# Altium PCB PCB1.PcbDoc
Units mm, origin at the board's own origin, x right, y up, seen from the top; angles counter-clockwise.
Board outline 30 x 30 mm, 2 copper layers (Top Layer, Bottom Layer); 33 components, 18 nets, 96 pads, 10 vias.
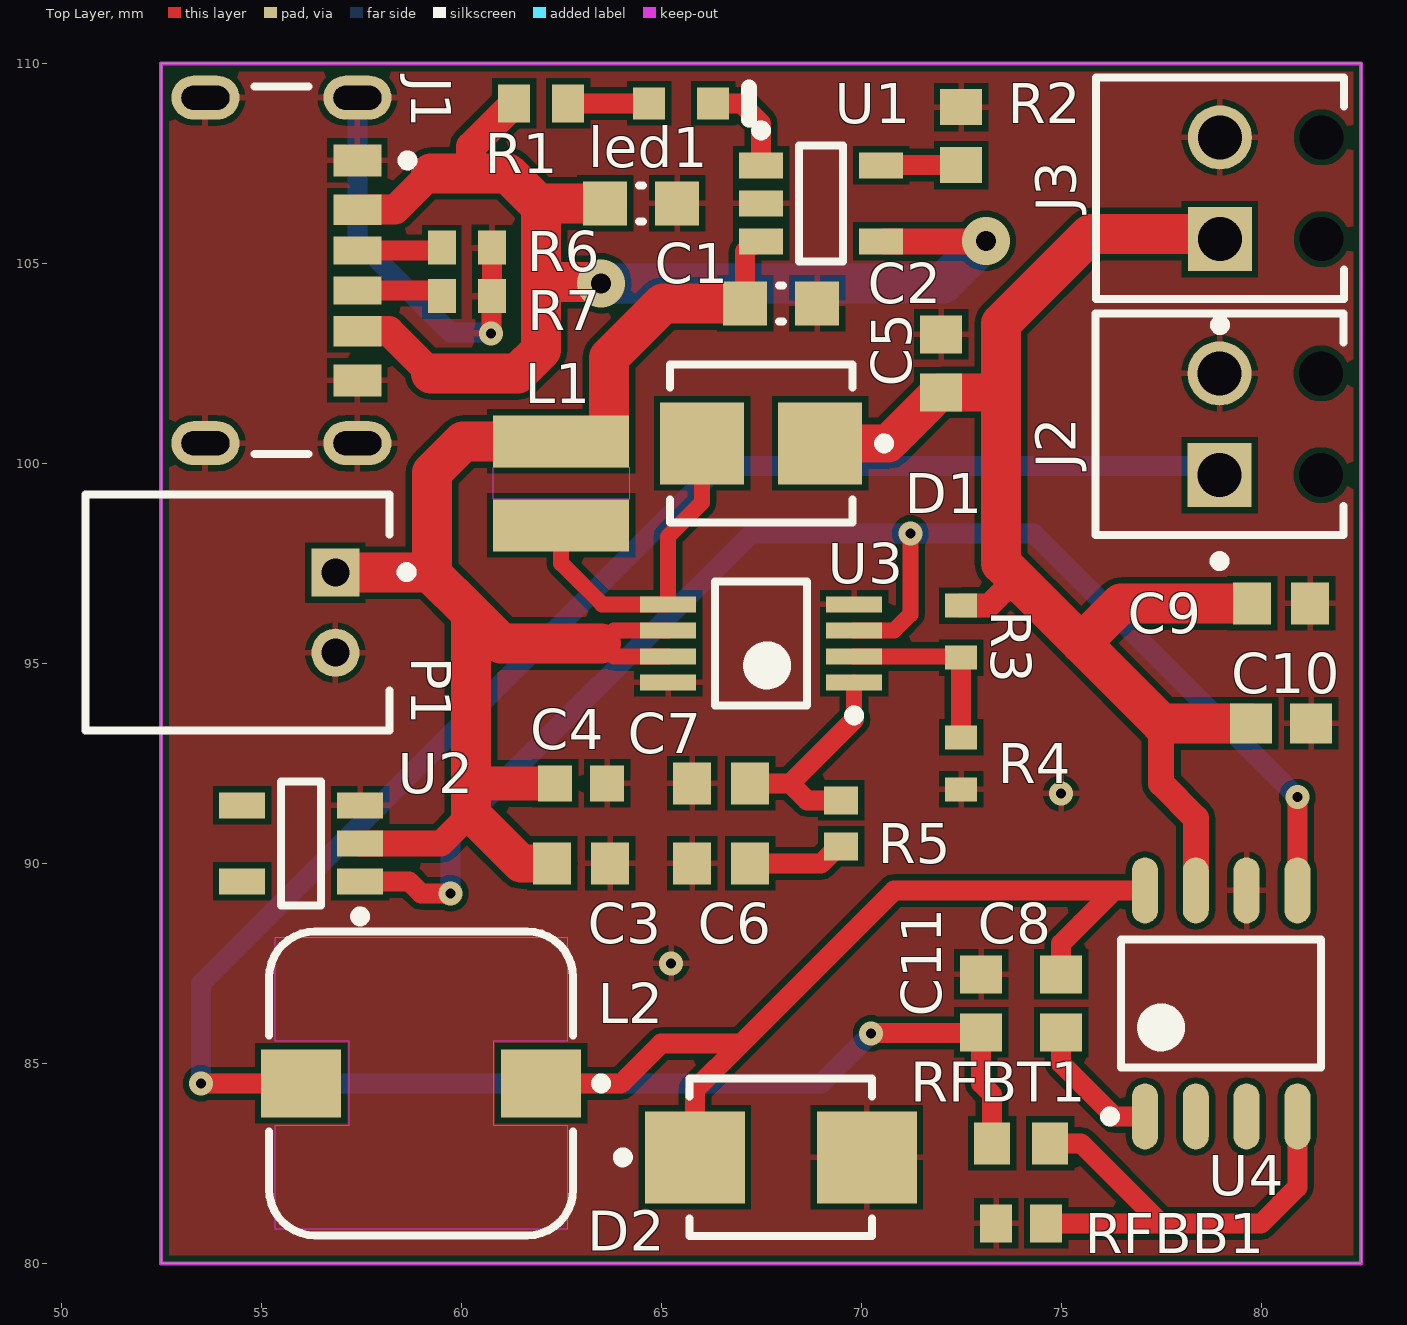
[diagram p0: Top Layer view]
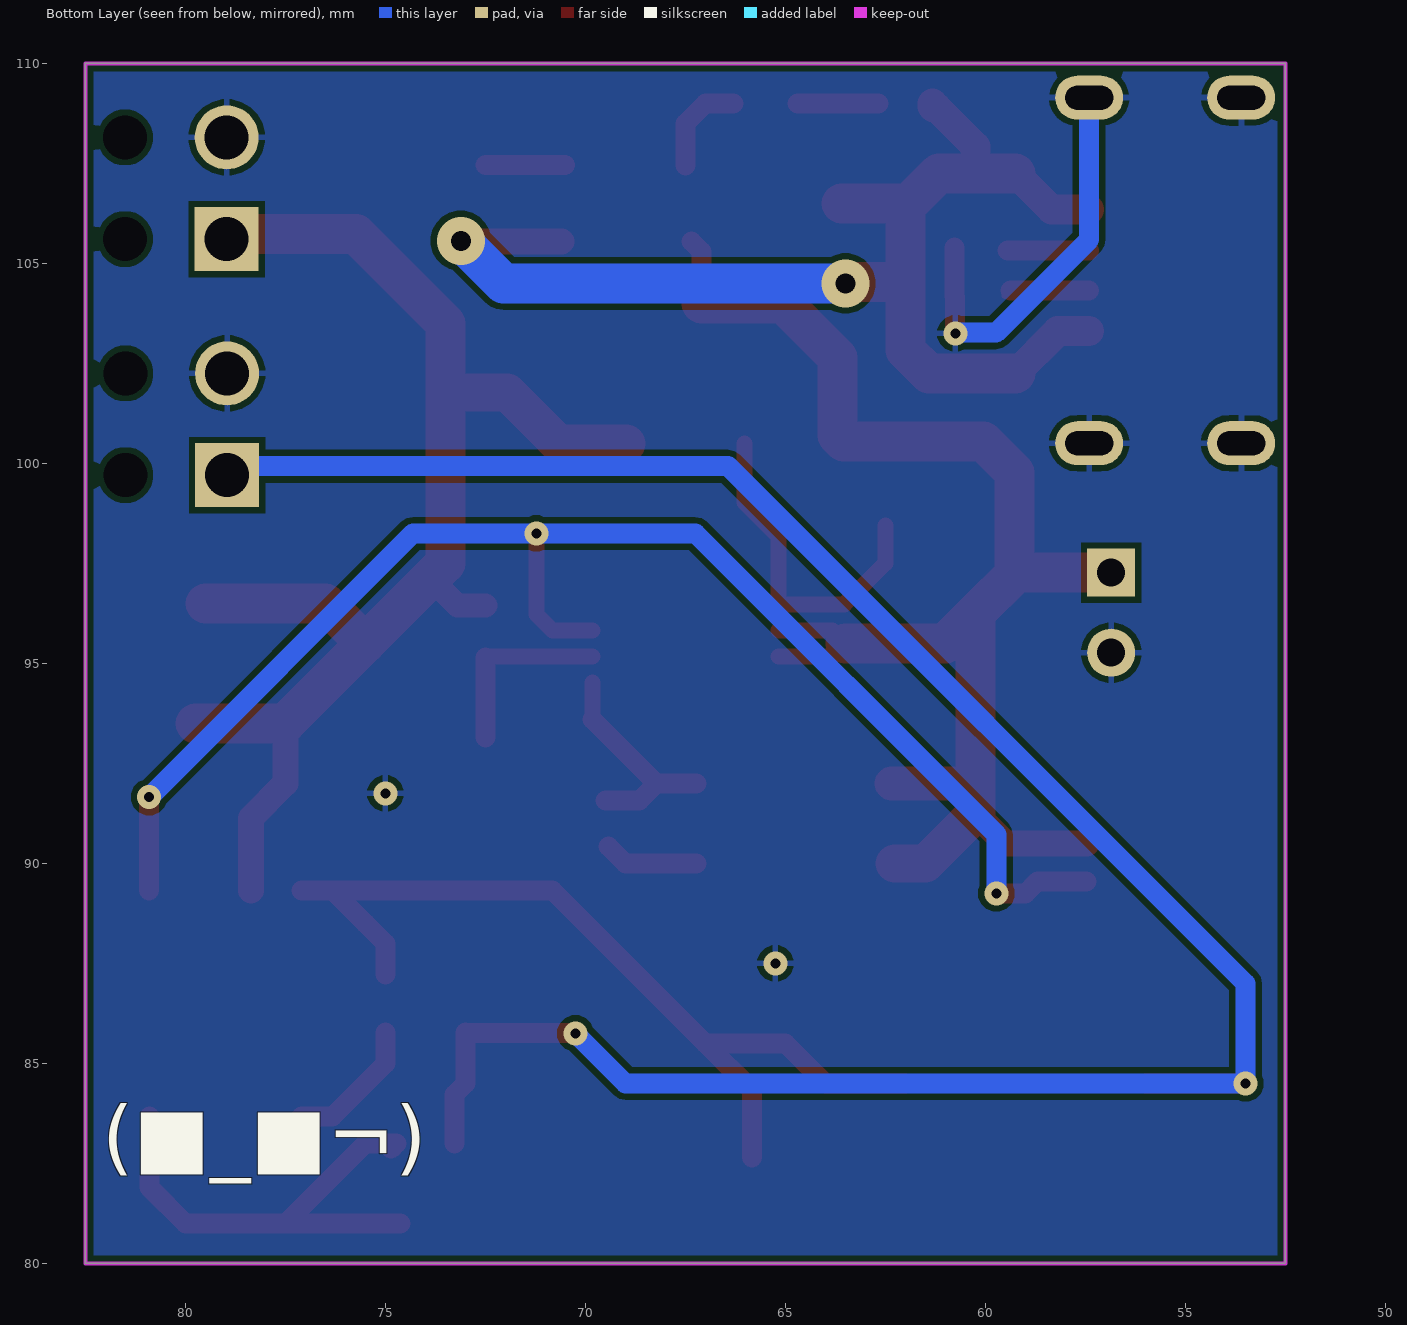
[diagram p1: Bottom Layer view, seen from below]

## Layer stack, top to bottom
Top Solder: solder mask 0.0102, Solder Resist, Dk 3.5
Top Layer: signal copper 0.0356
Dielectric 1: dielectric 0.32, FR-4, Dk 4.8
Bottom Layer: signal copper 0.0356
Bottom Solder: solder mask 0.0102, Solder Resist, Dk 3.5

## Board outline
52.5,80 82.5,80 82.5,110 52.5,110

## Design rules (kind name [scope] priority, off if disabled: settings)
BoardOutlineClearance [All] p1: gap=0.2 ignorepadtopadclearanceinfootprint=FALSE
Clearance [All] p1: gap=0.15 ignorepadtopadclearanceinfootprint=FALSE
HoleSize [All] p1: absolutevalues=TRUE maxlimit=3.5 minlimit=0.25 maxpercent=80.000 minpercent=20.000
HoleToHoleClearance [All] p1: gap=0.25 allowstackedmicrovias=TRUE
MinimumAnnularRing [All] p1: minimumring=0.175
MinimumSolderMaskSliver [All] p1: minsoldermaskwidth=0.075
PolygonConnect [All] p1: connectstyle=Relief reliefconductorwidth=0.15 reliefentries=4 polygonreliefangle="90 Angle" airgapwidth=0.15
RoutingVias [All] p1: holewidth=0.25 width=0.6 viastyle="Through Hole" minholewidth=0.25 minwidth=0.6 maxholewidth=2 maxwidth=1.5
SilkToSilkClearance [All] p1: silktosilkclearance=0.3
SilkToSolderMaskClearance [IsPad] p1: minsilkscreentomaskgap=0.1 clearancetoexposedcopper=TRUE
SolderMaskExpansion [All] p1: expansion=0.03 istentingtop=FALSE
SupplyNets "Schematic Supply Nets_4" [InNet('5V')] p1: voltage=0.000
SupplyNets "Schematic Supply Nets_3" [InNet('Vcc')] p2: voltage=0.000
SupplyNets "Schematic Supply Nets_2" [InNet('Vbat')] p3: voltage=0.000
SupplyNets "Schematic Supply Nets_1" [InNet('GND')] p4: voltage=0.000
SupplyNets "Schematic Supply Nets" [InNet('3.3V')] p5: voltage=0.000
UnRoutedNet [All] p1: checkbadconnections=TRUE
Width [All] p1: maxlimit=3 minlimit=0.15 preferedwidth=0.15
24 further rules are at their usual default settings.

## Classes and differential pairs
component class "Voltage Regulator Buck": C8 C10 D1 L2 RFBB1 RFBT1 U4
component class "Voltage Detector": U2
component class "Charge Management": C1 C6 led1 R1 R2 U1
component class top: J1 J2 J3 P1 R1 R4
component class "Voltage Regulators Boost": C1 C5 C6 D1 L2 R1 R2 R4 U3

## Components (designator, comment, footprint, x,y, rotation, side; value= is the part's Value field where it differs from the comment)
C1 "4.7uF" CAPC0603(1608)100_M 64.5,106.5 r180 top
C2 "4.7uF" CAPC0603(1608)100_M 68,104 r180 top
C3 "22uF" CAPC1608X90X35ML10T15 63,90 r180 top
C4 "0.1uF" CAPC1608X90X35LL15T15 63,92 r180 top
C5 "22uF" CAPC1608X90X35ML10T15 72,102.5 r270 top
C6 "4.7nF" CAPC1608X90X35ML10T15 66.5,90 r0 top
C7 "4.7nF" CAPC1608X90X35ML10T15 66.5,92 r0 top
C8 "10nF" CAPC1608X90X35ML10T15 75,86.5 r90 top
C9 "22uF" CAPC1608X90X35ML10T15 80.5,96.5 r180 top
C10 "2.2uF" CAPC1608X90X35NL15T15 80.5,93.5 r180 top
C11 "22uF" CAPC1608X90X35ML10T15 73,86.5 r270 top
D1 "15V 1A" FP-DO-214BA-IPC_C 67.5,100.5 r180 top value=150pF
D2 "60V, 1A" FP-SMB-MFG 67.992,82.654 r0 top
J1 "USB4125-GF-A-0190" FP-USB4125-GF-A-0190-MFG 54.407,104.825 r270 top
J2 "1725656" PHOE-1725656-2 78.96,100.98 r90 top
J3 "1725656" PHOE-1725656-2 78.969,106.881 r90 top
L1 "10uH, 2A" WE-MAIA_3015 62.5,99.5 r270 top
L2 "39uH, 1.1A" WE-PD_7332R 59,84.5 r270 top
led1 "598-8070-107F" DIAL-0603-2_V 65.5,109 r180 top
P1 "S2B-PH-K-S(LF)(SN)" JST-S2B-PH-K-S_V 54.407,96.268 r270 top
R1 "470Ω" RESC1608X55X30NL15T15 62,109 r180 top
R2 "2kΩ" RESC1608X55X30ML15T15 72.5,108.184 r270 top
R3 "82kΩ" RESC1608X55X25LL10T15 72.5,95.797 r270 top
R4 "27kΩ" RESC1608X55X25LL10T15 72.5,92.5 r270 top
R5 "1kΩ" RESC1609X50X30LL10T20 69.5,91 r90 top
R6 "5.1kΩ" RESC1608X55X30LL15T15 60.143,105.393 r0 top
R7 "5.1kΩ" RESC1608X55X30LL15T15 60.143,104.181 r0 top
RFBB1 "1.3kΩ" RESC1609X50X30NL10T20 74,81 r180 top
RFBT1 "2kΩ" RESC1608X55X30ML15T15 74,83 r0 top
U1 "MCP73831T-2DCI/OT" MCP73831T-2DCI/OT 69,106.5 r0 top
U2 "BD53E30G-MTR" BD53E30G-MTR 56,90.5 r180 top
U3 "ISL97519AIUZ" ISL97519AIUZ 67.5,95.5 r180 top
U4 "LM22671MRX-ADJ" LM22671MRX-ADJ/NOPB 79,86.5 r90 top

## Footprints (in the part's own frame and the unit in brackets; to place one, negate y for a bottom-side part, rotate by r counter-clockwise, add the part's x,y. Pads: shape width x height; smd on the part's side, far side on the other; paste and mask are expansions set on the pad)
BD53E30G-MTR [mm] "SOT23, 5-Leads, Body 2,90x2,80mm, Pitch 0,95mm, IPC Low Density"
  rect 1.15x0.65 smd: 1(-1.475,0.95) 2(-1.475,0) 3(-1.475,-0.95) 4(1.475,-0.95) 5(1.475,0.95)
  silkscreen extent -1.6,-1.55 0.5,1.95, body extent -0.9,-1.55 0.9,1.55, height 1.25
CAPC0603(1608)100_M [mm] "Chip Capacitor, Body 1.6x0.8mm, Height 1.0mm, IPC Low Density"
  rect 1.1x1.1 smd: 1(-0.9,0) 2(0.9,0)
  silkscreen extent -0.05,-0.45 0.05,0.45, body extent -0.87,-0.47 0.88,0.48, height 1
CAPC1608X90X35LL15T15 [mm] "Chip Capacitor, 2-Leads, Body 1.60x0.81mm, IPC High Density"
  rect 0.85x0.9 smd: 1(-0.65,0) 2(0.65,0)
  body extent -0.88,-0.48 0.87,0.48, height 0.9
CAPC1608X90X35ML10T15 [mm] "Chip Capacitor, 2-Leads, Body 1.60x0.80mm, IPC Low Density"
  rect 0.95x1.05 smd: 1(-0.725,0) 2(0.725,0)
  body extent -0.85,-0.45 0.85,0.45, height 0.9
CAPC1608X90X35NL15T15 [mm] "Chip Capacitor, 2-Leads, Body 1.60x0.81mm, IPC Medium Density"
  rect 1.05x1 smd: 1(-0.75,0) 2(0.75,0)
  body extent -0.88,-0.48 0.87,0.48, height 0.9
DIAL-0603-2_V [mm] "LED, 2-Leads, Body 1.6x0.8mm"
  rect 0.8x0.8 smd: 1(-0.8,0) 2(0.8,0)
  silkscreen extent -1.7,-0.4 -1.7,0.4, body extent -0.81,-0.39 0.81,0.39, height 0.71
FP-DO-214BA-IPC_C [mm]
  rect 2.1x2.05 smd paste+0 mask+0: 1(-1.475,0) 2(1.475,0)
  silkscreen extent -3.2,-1.97 2.28,1.97, body extent -2.63,-2.07 2.63,2.07, height 0.25
FP-SMB-MFG [mm]
  rect 2.5x2.3 smd paste+0 mask+0: 1(-2.15,0) 2(2.15,0)
  silkscreen extent -4.07,-1.97 2.28,1.97, body extent -3.5,-2.07 3.5,2.07, height 0.25
FP-USB4125-GF-A-0190-MFG [mm]
  rrect100% 1.1x1.7 hole 0.6 slot 1.2 at 90 deg paste-2539.97 mask+0: 1(-4.32,3) 2(4.32,3) 3(-4.32,-0.8) 4(4.32,-0.8)
  rect 0.7x1.2 smd paste+0 mask+0: A5(-0.5,3) B5(0.5,3)
  rect 0.76x1.2 smd paste+0 mask+0: A9(1.52,3) B9(-1.52,3)
  rect 0.8x1.2 smd paste+0 mask+0: A12(2.75,3) B12(-2.75,3)
  silkscreen extent -4.59,0.43 4.59,4.38, body extent -4.97,-3.57 4.97,3.95, height 0.25
ISL97519AIUZ [mm] "TSOP, 8-Leads, Body 3,00x3,00mm, Pitch 0,65mm, IPC Low Density"
  rect 1.4x0.4 smd: 1(-2.325,0.975) 2(-2.325,0.325) 3(-2.325,-0.325) 4(-2.325,-0.975) 5(2.325,-0.975) 6(2.325,-0.325) 7(2.325,0.325) 8(2.325,0.975)
  silkscreen extent -2.45,-1.55 1.15,1.92, body extent -1.55,-1.55 1.55,1.55, height 1.1
JST-S2B-PH-K-S_V [mm] "THD, 2-Leads, Body 7.6x5.9mm, Pitch 2mm"
  rect 1.2x1.2 hole 0.7: 1(-1,2.45)
  round 1.2 hole 0.7: 2(1,2.45)
  silkscreen extent -2.95,-3.8 2.95,4.35, body extent -2.95,-3.8 2.95,3.8, height 4.8
LM22671MRX-ADJ/NOPB [mm] "SOIC, 8-Leads, Body 4,90x3,90mm, Pitch 1,27mm, IPC Low Density"
  oval 1.65x0.65 smd: 1(-2.825,1.905) 2(-2.825,0.635) 3(-2.825,-0.635) 4(-2.825,-1.905) 5(2.825,-1.905) 6(2.825,-0.635) 7(2.825,0.635) 8(2.825,1.905)
  silkscreen extent -2.95,-2.5 1.6,2.9, body extent -2,-2.5 2,2.5, height 1.7
MCP73831T-2DCI/OT [mm] "SOT23, 5-Leads, Body 2,90x2,80mm, Pitch 0,95mm, IPC Low Density"
  rect 1.1x0.65 smd: 1(-1.5,0.95) 2(-1.5,0) 3(-1.5,-0.95) 4(1.5,-0.95) 5(1.5,0.95)
  silkscreen extent -1.62,-1.45 0.55,1.95, body extent -0.95,-1.45 0.95,1.45, height 1.45
PHOE-1725656-2 [mm] "Connector, 2-Leads, Body 6.2x5.4mm, Pitch 2.54mm"
  rect 1.6x1.6 hole 1.1: 1(-1.27,0)
  round 1.6 hole 1.1: 2(1.27,0)
  round 0 hole 1.1 unplated: MH1(-1.27,-2.54) MH2(1.27,-2.54)
  silkscreen extent -3.54,-3.1 2.77,3.1, body extent -2.77,-3.1 2.77,3.1, height 9
RESC1608X55X25LL10T15 [mm] "Chip Resistor, 2-Leads, Body 1.60x0.80mm, IPC High Density"
  rect 0.6x0.8 smd: 1(-0.65,0) 2(0.65,0)
  body extent -0.85,-0.45 0.85,0.45, height 0.55
RESC1608X55X30LL15T15 [mm] "Chip Resistor, 2-Leads, Body 1.60x0.80mm, IPC High Density"
  rect 0.7x0.85 smd: 1(-0.625,0) 2(0.625,0)
  body extent -0.87,-0.48 0.87,0.48, height 0.55
RESC1608X55X30ML15T15 [mm] "Chip Resistor, 2-Leads, Body 1.60x0.80mm, IPC Low Density"
  rect 0.9x1.05 smd: 1(-0.725,0) 2(0.725,0)
  body extent -0.87,-0.48 0.87,0.48, height 0.55
RESC1608X55X30NL15T15 [mm] "Chip Resistor, 2-Leads, Body 1.60x0.80mm, IPC Medium Density"
  rect 0.8x0.95 smd: 1(-0.675,0) 2(0.675,0)
  body extent -0.87,-0.48 0.87,0.48, height 0.55
RESC1609X50X30LL10T20 [mm] "Chip Resistor, 2-Leads, Body 1.55x0.85mm, IPC High Density"
  rect 0.7x0.85 smd: 1(-0.575,0) 2(0.575,0)
  body extent -0.82,-0.48 0.82,0.48, height 0.5
RESC1609X50X30NL10T20 [mm] "Chip Resistor, 2-Leads, Body 1.55x0.85mm, IPC Medium Density"
  rect 0.8x0.95 smd: 1(-0.625,0) 2(0.625,0)
  body extent -0.82,-0.48 0.82,0.48, height 0.5
WE-MAIA_3015 [mm] "SMD Power Inductor, 2-leads, body 3x3mm"
  rect 1.3x3.4 smd: 1(-1.05,0) 2(1.05,0)
  Top Layer keep-out region: -0.4,1.7 0.4,1.7 0.4,-1.7 -0.4,-1.7
  body extent -1.5,-1.5 1.5,1.5, height 1.5
WE-PD_7332R [mm] "SMT Shielded Power Inductor, 2-leads, body 7.3x7.3mm"
  rect 1.7x2 smd: 1(0,3) 2(0,-3)
  Top Layer keep-out region: 3.65,-3.65 1.05,-3.65 1.05,-1.8 -1.05,-1.8 -1.05,-3.65 -3.65,-3.65 -3.65,3.65 -1.05,3.65 -1.05,1.8 1.05,1.8 1.05,3.65 3.65,3.65
  silkscreen extent -3.8,-3.8 3.8,4.63, body extent -3.65,-3.65 3.65,3.65, height 3.22

## Part data
C1 C2: library part CMP-1035-02783-1, "CAP 4.7uF 6.3V -20% to +80% 0603 (1608 Metric) Thickness 1mm SMD", Case-EIA=0603, Case-Metric=1608, Rated Voltage="6.3 V", Tolerance="-20% to +80%", Max Thickness="1 mm", Technology=SMT
C3 C5 C9 C11: library part CMP-2006-02789-1, Manufacturer=Murata, Part Number=GRM188R60G226MEA0L
C4: library part CMP-2006-02168-1, Manufacturer="AVX Interconnect / Elco", Part Number=LD035C104KAB2A
C6 C7: library part CMP-2006-02924-1, Manufacturer=Murata, Part Number=GRM188R71H472KA01D
C8: library part CMP-2100-03642-1, "Chip Capacitor, 10 nF, +/- 10%, 50 V, -55 to 125 degC, 0603 (1608 Metric), RoHS, Tape and Reel", Case Code (Imperial)=0603, Case Code (Metric)=1608, Dielectric=X7R, Dielectric Material=Ceramic, Insulation Resistance=10GR, Manufacturer=Murata, Max Operating Temperature=125degC, Min Operating Temperature=-55degC, Package Description="2-Pin Surface Mount Device, Body 1.6 x 0.8 mm", Package Quantity=1, Tolerance=10%, Voltage=50V, Capacitance=10nF, Case/Package=0603, Datasheet URL=http://search.murata.co.jp/Ceramy/image/img/A01X/G101/ENG/GRM188R71H103KA01-01.pdf, Datasheet Version=42401.0, Depth=0.8mm, Height=0.8mm, Lead Free=LeadFree, Length=1.6mm, Manufacturer URL=http://www.murata.com/, Material=Ceramic, Mount=SurfaceMount, Number of Pins=2, Package Reference=0603, Packaging=TapeandReel, REACH SVHC=Unknown, RoHSCompliant=True, Termination=SMD/SMT, Thickness=0.035inch, Voltage Rating=50V, Voltage Rating (DC)=50V, Width=0.031inch
C10: library part CMP-2006-04537-1, Manufacturer="AVX Interconnect / Elco", Part Number=0603YD225MAT2A
D1: library part CMP-2000-06604-2, "LSM115JE3/TR13 DIODE SCHOTTKY 15V 1A DO214BA", Capacitance=150pF, Forward Current=1A, Manufacturer=Microsemi, Manufacturer Part Number=LSM115JE3/TR13, Max Junction Temp=+100°C, Max Repetitive Reverse Voltage=15V, Max Surge Forward Current=50A, Package=DO-214BA, Peak Reverse Current=10mA, Temperature="-55°C to +100°C", Temperature Range Low=-55°C, Automotive=No, Category=Diode, ComponentLink2Description=Datasheet, ComponentLink2URL=https://media.digikey.com/pdf/Data%20Sheets/Microsemi%20PDFs/LSM115J.pdf, Device Class L1="Discrete Semiconductors", Device Class L2=Diodes, Device Class L3="Rectifier Diodes", Digikey Description="DIODE SCHOTTKY 15V 1A DO214BA", Footprint Url=https://www.microsemi.com/packaging-information/partpackage/details?pid=5147, Height=2.92mm, Lead Free=Yes, Mouser Description="Schottky Diodes & Rectifiers Schottky Rectifier", Octopart=https://octopart.com/lsm115je3%2Ftr13-microsemi-17743343, Reverse Voltage=15V, RoHS=TRUE, Standoff Height=0.01mm, Temperature Range High=+100°C
D2: library part CMP-12790-000073-1, "DIODE SCHOTTKY 60V 1A SMB", Average Rectified Current=1A, Capacitance=110pF, Case/Package=SMB, Forward Voltage=700mV, Max Forward Surge Current (Ifsm)=30A, Max Operating Temperature=150°C, Max Repetitive Reverse Voltage (Vrrm)=60V, Min Operating Temperature=-65°C, Package Quantity=3000, Peak Reverse Current=500uA, Contact Plating=Tin, Current Rating=1A, Element Configuration=Single, Forward Current=1A, Height=2.42mm, Lead Free="Lead Free", Length=4.57mm, Max Reverse Voltage (DC)=60V, Mount="Surface Mount", Number of Pins=2, Output Current=1A, Packaging="Tape and Reel", Peak Non-Repetitive Surge Current=30A, Polarity=Standard, Radiation Hardening=No, REACH SVHC="No SVHC", Termination=SMD/SMT, Voltage Rating (DC)=60V, Weight=0.00328oz, Width=3.94mm
J1: library part CMP-245163-000004-1, "CONN RCPT TYPE C 6P SMD RA"
J2 J3: library part CMP-2000-05299-1, "Male Header, Pitch 2.54 mm, 1 x 2 Position, Height 9 mm, Tail Length 3.5 mm", Colour=Green, Manufacturer="Phoenix Contact", Content=250pc(s), Datasheet URL=http://datasheet.octopart.com/1725656-Phoenix-Contact-datasheet-5302866.pdf, Datasheet Version=Apr-08, Industrial packaging=Yes, Manufacturer part No.=1725656, Manufacturer URL=http://www.phoenixcontact.com/, Number of contacts=2, Pitch=2.54mm, Type=MPT0,5/2-2,54
L1: library part CMP-03913-56466825-2, "78438335100 Inductor, Aec-Q200, 10Uh, Shielded/0.85A Rohs Compliant: Yes", Ambient Temperature Range High=85°C, Ambient Temperature Range Low=-40°C, Case Code (Imperial)=1212, Case Code (Metric)=3030, Current Rating=850mA, DC Resistance (DCR)=446mΩ, Inductance=10µH, Max Operating Temperature=125°C, Ratings=AEC-Q200, Saturation Current=2A, Self Resonant Frequency=21MHz, Test Frequency=100kHz, Tolerance=30%, Case/Package=1212, Composition=Wirewound, Core Material=Ferrite, Height=1.5mm, Height - Seated (Max)=1.4986mm, Length=3mm, Min Operating Temperature=-40°C, Mount="Surface Mount", NexarPartId=56466825, Number of Pins=2, RoHS=Compliant, Shielding=Shielded, Width=3mm
L2: library part CMP-1396-00047-2, Ambient Temperature Range High=85°C, Ambient Temperature Range Low=-40°C, Case/Package=Nonstandard, Current Rating=1.03A, DC Resistance (DCR)=209mΩ, Inductance=39µH, Inductance Tolerance=20%, Max Operating Temperature=125°C, Resistance=320mΩ, Saturation Current=1.1A, Self Resonant Frequency=15MHz, Test Frequency=1kHz, Composition=Wirewound, Core Material=Ferrite, Height=3.2mm, Height - Seated (Max)=3.5052mm, Length=7.3mm, Max DC Current=1.03A, Min Operating Temperature=-40°C, Mount="Surface Mount", NexarPartId=22866977, Number of Pins=2, Packaging="Cut Tape (CT)", REACH SVHC=Unknown, RMS Current (Irms)=1.03A, RoHS=Compliant, Series Resistance=320mΩ, Shielding=Shielded, Termination=SMD/SMT, Tolerance=20%, Width=7.3mm
led1: library part CMP-2000-05654-1, "Single Color LED, 2 V, -30 to 85 degC, 2-Pin SMD (0603), RoHS, Tape and Reel", Emitting Color=YellowGreen, Forward Current=25mA, Forward Voltage=2.4V, Manufacturer=Dialight, Operating Temp Range=-40Cto100C, Operating Temperature Classification=Industrial, Package Description="2-Pin Surface Mount Device, Body 1.6 x 0.8 mm", Package Reference=0603, Package Type=SMD, Power Dissipation=60W, Reverse Voltage=5V, Test Current (It)=20mA, Chip Material=GaP, Datasheet URL=https://datasheet.ciiva.com/4688/598-selectorguide-18902-4688880.pdf, Datasheet Version="Rev. 2, 10/2008", DELETED=Compliant, Dominant Wave Length=568nm, High Brightness=No, Lens Dimensions=1.1x0.8x0.4mm, Lum Intensity=20mcd, Luminous Intensity=20mcd, Main Category=ChipLED, Manufacturer URL=http://www.dialight.com/, Mounting=SurfaceMount, Mounting Technology=SurfaceMount, Number of  Elements=1, Packaging=TapeandReel, Pin Count=2, Product Depth (mm)=0.8mm, Product Height (mm)=0.7mm, Product Length (mm)=1.6mm, Rad Hardened=No, Shape Type=Rectangular, Type=Uni-Color, Viewing Angle=140deg
P1: library part CMP-1755-00004-1, "Male Header, Pitch 2 mm, 1 x 2 Position, Height 4.8 mm, Tail Length 3.4 mm, -25 to 85 degC, RoHS, Bulk", Capacitance="10 uF", Case\Package=Radial, Max Operating Temperature="85 degC", Min Operating Temperature="-40 degC", Package Quantity=200, Tolerance=20%, Voltage Rating="50 V", ComponentLink1Description=Datasheet, ComponentLink1URL=http://www.jst-mfg.com/product/pdf/eng/ePH.pdf, DatasheetVersion=Dec-12, Diameter="5 mm", Height="11 mm", Lead Pitch="2 mm", Length="11 mm", Mount="Through Hole", PackageDescription="Male Header, Pitch 2 mm, 1 x 2 Position, Height 4.8 mm, Tail Length 3.4 mm", PackageReference=S2B-PH-K-S, Packaging=Bulk, Pins=2, Radiation Hardening=No, REACH SVHC="No SVHC", RoHSCompliant=true, Voltage Rating (DC)="50 V"
R1: library part CMP-2000-00795-1, Manufacturer=Panasonic, Part Number=ERJ-3GEYJ471V
R2 RFBT1: library part CMP-2000-00317-1, Manufacturer=Panasonic, Part Number=ERJ-3EKF2001V
R3: library part CMP-2000-06947-1, "Chip Resistor, 82 KOhm, +/- 1%, 0.1 W, -55 to 155 degC, 0603 (1608 Metric), RoHS, Tape and Reel", Case Code - in=0603, Case Code - mm=1608, Manufacturer=Yageo, Operating Temperature Range=-55Cto+155C, Package / Case=0603(1608metric), Package Description="2-Pin Surface Mount Device, Body 1.6 x 0.8 mm", Power Rating=100mW, Resistance=82kOhms, Temperature Coefficient=100PPM/C, Tolerance=1%, Voltage Rating=75V, Brand=Yageo, Datasheet URL=http://www.yageo.com/documents/recent/PYu-RC_Group_51_RoHS_L_7.pdf, Datasheet Version="Rev. 7, 05/2017", Height=0.45mm, Length=1.6mm, Manufacturer URL=http://www.yageo.com/, Mounting Technology=SurfaceMount, Package Reference=0603, Packaging=Reel, Product=ThickFilmResistorsGeneralPurpose, Product Category=ThickFilmResistors, RoHS=True, Series=RC, Termination Style=SMD/SMT, Type=GeneralPurposeChipResistorSurfaceMount, Unit Weight=0.000071oz, Width=0.8mm
R4: library part CMP-2000-06933-1, "Chip Resistor, 27 KOhm, +/- 1%, 0.1 W, -55 to 155 degC, 0603 (1608 Metric), RoHS, Tape and Reel", Case Code - in=0603, Case Code - mm=1608, Manufacturer=Yageo, Operating Temperature Range=-55Cto+155C, Package Description="2-Pin Surface Mount Device, Body 1.6 x 0.8 mm", Power Rating=100mW, Resistance=27kOhms, Temperature Coefficient=100PPM/C, Tolerance=1%, Voltage Rating=50V, Datasheet URL=http://www.yageo.com/documents/recent/PYu-RC_Group_51_RoHS_L_7.pdf, Datasheet Version="Rev. 7, 05/2017", Manufacturer URL=http://www.yageo.com/, Mounting Technology=SurfaceMount, Package Reference=0603, Packaging=Reel, Product=ThickFilmResistorsGeneralPurpose, Series=RC, Termination Style=SMD/SMT
R5: library part CMP-2000-02972-1, Manufacturer="Vishay Dale", Part Number=CRCW06031K00FKEC
R6 R7: library part CMP-2000-00803-1, Manufacturer=Panasonic, Part Number=ERJ-3GEYJ512V
RFBB1: library part CMP-2000-02988-1, Manufacturer="Vishay Dale", Part Number=CRCW06031K30FKEA

## Via types
v1: diameter 0.6, hole 0.25, Top Layer to Bottom Layer, 8 vias
v2: diameter 1.2, hole 0.5, Top Layer to Bottom Layer, 2 vias

## Nets (pads, with @x,y where several pads share a name; then routed paths per layer and width w, separated by ;. In a path a pad name is that pad's centre, name@x,y a point inside that pad or via, vN(x,y) a via of type N, cw(c..) or ccw(c..) an arc to the next point about the centre after c; other vN are vias at no path point)
3.3V: C11.2 J2.1 L2.2 RFBT1.1 | length 59
  Top Layer w0.5: v1(53.5,84.5) L2.2 ; v1(70.25,85.75) 70.262,85.763 72.987,85.763 C11.2 73,84.5 73.275,84.225 RFBT1.1
  Bottom Layer w0.5: v1(70.25,85.75) 69,84.5 v1(53.5,84.5) 53.5,87 66.431,99.931 J2.1@79.209,99.931
5V: C5.2 C9.2 C10.2 D1.1 J3.1 R3.1 U4.7 | length 35.7
  Top Layer w0.15: C5.2@71.95,101.775 C5.2 ; 73.5,97.347 73.5,97.5
  Top Layer w0.6: R3.1 73.197,96.447 73.75,97
  Top Layer w0.65: 77.5,93.5 77.5,92 78.365,91.135 U4.7
  Top Layer w0.95: D1.1 70.675,100.5 C5.2@71.95,101.775 ; C5.2 73.225,101.775
  Top Layer w1: J3.1@78.96,105.74 75.74,105.74 73.5,103.5 73.5,97.5 75.5,95.5 ; C9.2@79.5,96.5 76.5,96.5 75.5,95.5 ; C10.2 77.5,93.5 75.5,95.5
GND: C1.1 C2.1 C3.1 C4.1 C5.1 C6.1 C7.1 C9.1 C10.1 C11.1 D2.2 J1.1 J1.2 J1.3 J1.4 J1.A12 J1.B12 J2.2 J3.2 P1.2 R2.1 R4.2 R6.2 R7.2 RFBB1.2 U1.2 U2.3 U3.4 U3.8 U4.6 | length 10
  Top Layer w0.5: v1(60.75,103.25) 60.759,103.259 60.759,104.172 R7.2 R6.2
  Bottom Layer w0.5: J1.1 57.407,105.593 59.731,103.269 60.731,103.269 v1(60.75,103.25)
  other v1: 65.25,87.5 75,91.75
NetC6_2: C6.2 R5.1 | length 2.5
  Top Layer w0.15: R5.1@69.425,90.425 R5.1
  Top Layer w0.5: C6.2 69,90 R5.1@69.425,90.425
NetC7_2: C7.2 R5.2 U3.1 | length 5.6
  Top Layer w0.4: 69.825,93.6 U3.1
  Top Layer w0.5: C7.2 68.225,92 ; R5.2 68.65,91.575 68.225,92 ; 69.825,93.6 68.225,92
NetC8_1: C8.1 U4.1 | length 3.4
  Top Layer w0.5: C8.1 75,85 76.325,83.675 U4.1
NetC8_2: C8.2 D2.1 L2.1 U4.8 | length 23.1
  Top Layer w0.5: L2.1 64,84.5 65,85.5 67,85.5 ; D2.1 65.842,84.342 67,85.5 ; C8.2 75,88 75.5,88.5 76.325,89.325 ; U4.8 76.325,89.325 ; 67,85.5 70.825,89.325 76.325,89.325
NetD1_2: D1.2 L1.2 U3.5 | length 8.4
  Top Layer w0.4: L1.2 62.5,97.5 63.525,96.475 U3.5 65.175,98.175 66.025,99.025 D1.2
NetJ1_A5: J1.A5 R6.1 | length 2.1
  Top Layer w0.15: R6.1@59.45,105.325 R6.1
  Top Layer w0.5: J1.A5 R6.1@59.45,105.325
NetJ1_B5: J1.B5 R7.1 | length 2.2
  Top Layer w0.15: R7.1@59.374,104.325 R7.1
  Top Layer w0.5: J1.B5 R7.1@59.374,104.325
Netled1_1: led1.1 U1.1 | length 2.5
  Top Layer w0.5: led1.1 67,109 67.5,108.5 U1.1
Netled1_2: led1.2 R1.1 | length 2
  Top Layer w0.5: R1.1 led1.2
NetR2_2: R2.2 U1.5 | length 2
  Top Layer w0.15: U1.5 U1.5@70.509,107.459
  Top Layer w0.5: U1.5@70.509,107.459 R2.2
NetR3_2: R3.2 R4.1 U3.2 | length 4.7
  Top Layer w0.15: R3.2@72.472,95.175 R3.2
  Top Layer w0.4: U3.2 R3.2@72.472,95.175
  Top Layer w0.5: R4.1 R3.2
NetRFBB1_1: RFBB1.1 RFBT1.2 U4.4 | length 12.3
  Top Layer w0.15: RFBT1.2 74.725,82.925 RFBT1.2@74.8,82.925
  Top Layer w0.5: RFBB1.1 77.5,81 ; RFBT1.2 75.5,83 77.5,81 ; RFBT1.2@74.8,82.925 RFBT1.2@74.855,82.87 ; U4.4 80.905,81.905 80,81 77.5,81
NetU2_1: U2.1 U3.3 U4.5 | length 36.8
  Top Layer w0.4: U3.3 70.825,95.825 71.229,96.229 v1(71.229,98.251) ; U4.5 U4.5@80.906,89.326 ; v1@80.906,91.657 v1(80.908,91.658)
  Top Layer w0.5: U2.1 58.702,89.55 59.001,89.251 v1@59.702,89.251 ; U4.5@80.906,89.326 v1@80.906,91.657
  Bottom Layer w0.5: v1(59.729,89.251) 59.729,90.729 67.251,98.251 v1(71.229,98.251) 74.315,98.251 v1(80.908,91.658)
Vbat: C2.2 C3.2 C4.2 L1.1 P1.1 U1.3 U2.2 U3.6 U3.7 | length 38.8
  Top Layer w0.15: U1.3@67.35,105.55 U1.3
  Top Layer w0.4: U3.7 63.825,95.175 63.5,95.5 63.825,95.825 U3.6
  Top Layer w0.5: C2.2 67.1,105.3 U1.3@67.35,105.55
  Top Layer w0.65: U2.2 57.915,90.5 59.5,90.5 60.25,91.25
  Top Layer w0.85: 60.247,92 60.25,92 C4.2
  Top Layer w0.95: 60.25,91.25 61.5,90 C3.2
  Top Layer w1: P1.1 59.232,97.268 ; 60.25,91.25 60.25,92 60.25,96.25 ; 63.5,95.5 61,95.5 60.25,96.25 ; C2.2 65.05,104 63.7,102.65 63.7,100.7 63.55,100.55 60.05,100.55 59.268,99.768 59.268,97.305 59.232,97.268 ; 59.232,97.268 60.25,96.25
Vcc: C1.2 J1.A9 J1.B9 R1.2 U1.4 | length 32.4
  Top Layer w0.15: 62,106.414 62.086,106.5 ; U1.4 U1.4@70.55,105.5
  Top Layer w0.5: U1.4@70.55,105.5 U1.4@70.6,105.55
  Top Layer w0.65: U1.4@70.6,105.55 73.105,105.55 v2(73.117,105.563)
  Top Layer w0.75: J1.A9 58.195,103.305 59.25,102.25 ; J1.B9 57.412,106.35 58.35,106.35 59.25,107.25 ; 60.25,107.25 60.25,107.925 61.225,108.9 61.3,108.9 61.325,108.925 R1.2
  Top Layer w1: 59.25,102.25 61.414,102.25 62,102.836 62,104.75 ; 59.25,107.25 60.25,107.25 61.164,107.25 62,106.414 62,104.75 ; 62.086,106.5 C1.2 ; v2(63.5,104.5) 63.462,104.538 62.212,104.538 62,104.75
  Bottom Layer w1: v2(63.5,104.5) 72.055,104.5 v2(73.117,105.563)
pads on no net: J2.MH1 J2.MH2 J3.MH1 J3.MH2 U2.4 U2.5 U4.2 U4.3

## Polygon pours and split planes (outlines as drawn)
GND on Top Layer "GND_L01_P000" (solid, pour order 0): 52.5,110 82.5,110 82.5,80 52.5,80
GND on Bottom Layer "GND_L02_P002" (solid, pour order 2): 52.5,110 82.5,110 82.5,80 52.5,80

## Keep-outs
Keep-Out Layer:
  the board outline again, w0.1

## Silkscreen, mask and mechanical layers (free items; w line width, h text height)
Bottom Overlay:
  text "(⌐■_■)" at 73.965,81.975 h2.52